# Altium PCB CPJ.PcbDoc (part 2 of 2)
Units mm, origin at the board's own origin, x right, y up, seen from the top; angles counter-clockwise.
Board outline 210 x 60 mm, 4 copper layers (Top Layer, Inner_1, PWR_SIG, Bottom Layer), stack 1.63 mm thick; 123 components, 76 nets, 368 pads, 236 vias.
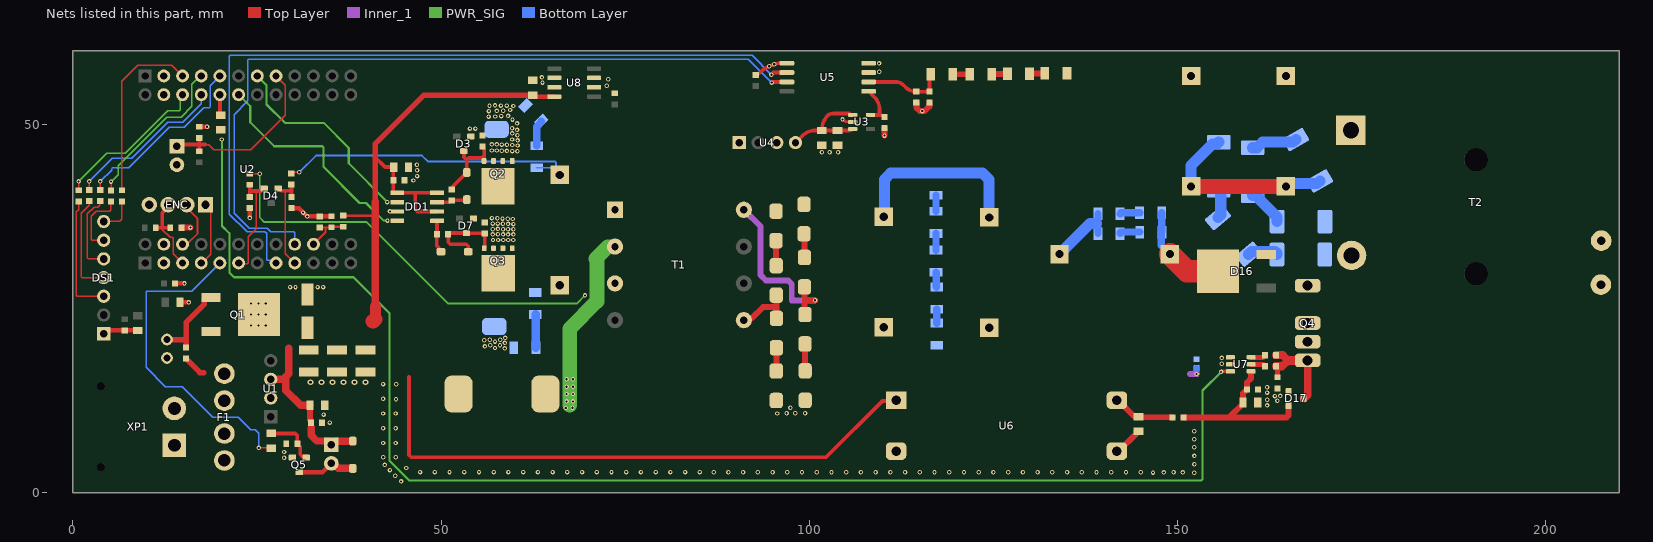
[diagram p4: the nets of this part, all layers, seen from the top]

## Via types
v1: diameter 0.6, hole 0.3, Top Layer to Bottom Layer, tented both sides, 230 vias
v2: diameter 0.8, hole 0.4, Top Layer to Bottom Layer, tented both sides, 6 vias

## Nets (pads, with @x,y where several pads share a name; then routed paths per layer and width w, separated by ;. In a path a pad name is that pad's centre, name@x,y a point inside that pad or via, vN(x,y) a via of type N, cw(c..) or ccw(c..) an arc to the next point about the centre after c; other vN are vias at no path point) (continued)
+5V_ISO_RAW: C15.2 R21.2 U3.1 U3.3 U4.4 | length 14.2
  Top Layer w0.5: U4.4@98.135,47.55 99.041,48.456 cw(c100.837,46.66) 100.837,49.2 C15.2@101.7,49.2 ; U3.3@105.925,49.4 cw(c105.442,49.883) 105.442,49.2 R21.2@103.85,49.2 C15.2@101.7,49.2 ; U3.1@105.925,51.3 105.55,51.35 105.4,51.5 103.249,51.5 ccw(c103.25,50.393) 102.415,51.12 ccw(c104.635,49.2) C15.2@101.7,49.2
+15V_SIC: C24.1 C26.1 D17.2 R48.1 U7.1 | length 23.2
  Top Layer w0.5: C24.1@158.925,12.1 C24.1@158.925,12.25 ; C26.1@159.275,13.85 159.325,13.85 C26.1@159.475,14
  Top Layer w0.8: R48.1@150.85,10.225 157.05,10.225 ; C24.1@158.925,12.1 157.05,10.225 ; C24.1@158.925,12.25 158.925,13.5 C26.1@159.275,13.85 ; C26.1@159.475,14 159.475,14.975 160.025,15.525 U7.1@160.025,16.403 ; D17.2@165.125,11.85 165.125,10.518 164.832,10.225 157.05,10.225
GND: C1.2 C2.2 C3.1 C4.1 C5.1 C6.1 C7.2 C8.2 C9.1 C10.1 C11.1 C12.1 C14.1 C18.1 C25.1 C27.1 C28.1 C29.1 C30.1 C31.1 C32.1 D2.2 D3.1 D5.2 D7.1 DD1.3 DS1.1 ENC.C NT.2 Q2.1 Q3.1 Q5.2 R1.2 R13.1 R15.1 R19.1 R20.1 R46.1 S1.3 SW1.2 U1.2 U2.3 U2.4 U2.27 U2.28 U4.1 U5.5 U6.2 U6.4 U8.2 U8.3 U8.6 U8.7 XP1.2 | length 27.6
  Top Layer w0.5: C18.1@92.75,56.75 92.925,56.784 ccw(c92.745,57.25) 93.095,56.893 cw(c96.777,53.164) 96.225,58.376 U5.5@96.975,58.33
  Top Layer w0.6: DS1.1@4.175,21.595 4.63,22.05 C7.2@7.025,22.05 8.775,22.05 C8.2@8.8,22.025 ; C31.1@13.875,28.425 v1(15.15,28.425) ; C32.1@14.55,25.85 v1(15.725,25.85) ; C9.1@17.15,49.7 v1(18.225,49.7) ; v1(24.025,37.325) R20.1@24.025,38.65 ; R15.1@29.675,38.65 30.7,38.65 v1(31.825,37.525) 35.1,37.525 R1.2@35.125,37.55
  Top Layer w0.8: C6.1@14.725,36 v1(15.95,36) ; U6.4@141.8,5.65 142.05,5.65 144.475,8.075 144.475,8.225 144.575,8.325 C25.1@144.725,8.325
  Inner_1 w0.8: 151.7,16.125 v1(152.625,16.125)
  Bottom Layer w0.3: v1(152.3,6.175) v1@152.381,6.175 ; v1(152.3,7.25) v1@152.381,7.25 ; v1(152.3,8.35) v1@152.381,8.35
  Bottom Layer w0.8: v1(152.625,16.125) NT.2@152.625,16.925
  other v1: 44.575,1.525 43.775,2.3 152.3,2.7 146.7,2.725 148.15,2.75 150.75,2.75 87.025,2.775 89.025,2.775 91.025,2.775 93.025,2.775 95.025,2.775 97.025,2.775 99.025,2.775 101.025,2.775 103.025,2.775 105.025,2.775 107.025,2.775 109.025,2.775 111.025,2.775 113.025,2.775 115.025,2.775 117.025,2.775 119.025,2.775 121.025,2.775 123.025,2.775 125.025,2.775 127.025,2.775 129.025,2.775 131.025,2.775 133.025,2.775 135.025,2.775 137.025,2.775 139.025,2.775 141.025,2.775 143.025,2.775 145.025,2.775 149.5,2.775 47.15,2.8 49.15,2.8 51.15,2.8 53.15,2.8 55.15,2.8 57.15,2.8 59.15,2.8 61.15,2.8 63.15,2.8 65.15,2.8 67.15,2.8 69.15,2.8 71.15,2.8 73.15,2.8 75.15,2.8 77.15,2.8 79.15,2.8 81.15,2.8 83.15,2.8 85.15,2.8 43.05,3.075 45.275,3.35 42.35,3.775 152.325,3.85 28.675,4.75 42.15,4.8 43.85,4.8 152.325,5 28.675,5.525 42.125,6.75 43.825,6.75 42.125,8.75 43.825,8.75 34.875,9.525 34.05,10.6 42.125,10.75 43.825,10.75 43.875,12.7 42.125,12.75 43.9,14.725 42.125,14.75 58.65,19.6 57.325,19.65 55.95,19.875 56.675,20.025 58,20.025 58.675,20.35 57.325,20.525 55.875,20.7 56.6,20.775 58.05,20.775 58.725,21.025 29.5,27.925 30.225,27.925 33.225,27.925 33.975,27.925 57.05,34.325 57.75,34.325 58.45,34.325 59.125,34.325 59.8,34.325 57.025,35.075 58.425,35.075 59.1,35.075 59.825,35.075 57.725,35.1 57.025,35.775 58.425,35.775 59.1,35.775 59.825,35.775 57.725,35.825 59.825,36.475 59.1,36.5 58.4,36.525 57.025,36.55 57.7,36.55 59.725,37.175 59.05,37.2 58.35,37.225 57.65,37.275 56.9,37.3 31.261,38.04 43.05,38.2 46.25,42.4 46.75,43 46.75,43.8 46.725,44.55 60.375,46.375 59.675,46.4 58.95,46.425 58.25,46.45 56.875,46.475 57.55,46.475 60.4,47.15 59.675,47.225 58.95,47.25 58.25,47.275 56.875,47.3 57.55,47.3 60.4,47.85 59.65,47.975 60.375,48.55 59.675,48.8 60.325,49.275 53.925,49.45 54.669,49.452 59.65,49.5 60.325,50.15 59.7,50.675 56.45,51.075 57.35,51.1 58.175,51.15 59.1,51.175 56.5,51.825 57.575,51.85 58.45,51.875 59.375,51.975 59.825,52.525 56.575,52.55 58.125,52.575 58.925,52.575 57.325,52.6 72.5,55.275 63.775,55.7 72.7,56.15 63.7,56.4 94.575,57.925 95.25,58.2
  other v2: 32.25,15 33.75,15 35.25,15 36.75,15 38.25,15 39.75,15
HV_BUS: C19.2 C20.2 C21.2 C22.2 C23.1 D8.1 D9.1 R26.1 R27.2 R34.1 R38.1 T2.1 | length 34.6
  Bottom Layer w1: R34.1@139.225,35.2 139.225,36.55 R38.1@139.225,37.9
  Bottom Layer w1.5: C19.2@110.125,37.475 110.2,37.55 110.2,42.521 111.079,43.4 R27.2@117.225,43.4 123.546,43.4 124.425,42.521 C20.2@124.425,37.375 ; C23.1@134,32.4 138.15,36.55 139,36.55
HV_GND: C15.1 C16.2 C17.1 C19.1 C20.1 D14.2 D15.2 NT.1 pad.2 Q4.2 R21.1 R22.2 R31.1 T2.3 U3.2 U4.3 U5.3 U5.4 | length 6.2
  Top Layer w0.3: U3.2@105.37,50.35 U3.2@105.925,50.35
  Top Layer w0.35: v1(104.525,50.7) ccw(c105.37,51.545) U3.2@105.37,50.35
  Top Layer w0.8: D15.2@99.248,12.898 D15.2@99.4,13.05 ; v1(110.225,48.5) C17.1@110.225,49.525 ; C16.2@114.525,52.975 114.55,52.975 114.55,52.3 115.019,51.831 115.681,51.831 116.325,52.475 116.325,53 R22.2@116.35,53
  other v1: 95.675,10.75 96.925,10.775 98.1,10.775 99.45,10.775 97.45,11.55 101.725,46.25 102.775,46.25 103.925,46.25 115.35,51.831 109.525,57.175 109.5,58.3
HV_OUT: 
NetC1_1: C1.1 R1.1 R3.2 U2.44 | length 6.3
  Top Layer w0.15: U2.44@32.665,33.725 U2.44@32.85,33.725 ; R1.1@35.125,36.05 R1.1@35.2,36.125
  Top Layer w0.3: U2.44@32.665,33.725 34.288,35.347 34.288,35.987 ; C1.1@33.525,36.025 35.1,36.025 R1.1@35.125,36.05 ; R1.1@35.2,36.125 R3.2@36.7,36.125
NetC6_2: C6.2 ENC.D R4.1 U2.29 | length 11.5
  Top Layer w0.2: 12.15,36 12.15,35.725 13.2,34.675 13.483,34.675 13.6,34.558 13.6,32.47 U2.29@14.885,31.184
  Top Layer w0.5: R4.1@11.25,36 12.15,36 ; ENC.D@12.925,39.125 12.925,38.807 12.15,38.032 12.15,36 ; C6.2@13.225,36 12.15,36
NetC9_2: C9.2 R5.1 SW1.1 U2.15 | length 24.6
  Top Layer w0.2: 17.937,47.288 18.437,47.288 19.15,46.575 24.15,46.575 28.85,51.275 28.85,55.32 U2.15@27.585,56.585
  Top Layer w0.5: SW1.1@14.22,47 14.508,47.288 17.15,47.288 ; R5.1@17.15,46.375 17.15,47.288 ; C9.2@17.15,48.2 17.15,47.288 ; 17.937,47.288 17.15,47.288
NetC12_2: C12.2 R11.1 | length 3.6
  Bottom Layer w1: R11.1@62.975,47.125 62.975,49.712 63.611,50.348 C12.2@63.611,50.489
NetC14_2: C14.2 R17.1 | length 4.5
  Bottom Layer w1.2: C14.2@62.85,19.675 R17.1@62.85,24.2
NetC16_1: C16.1 R22.1 R23.2 U5.2 | length 11
  Top Layer w0.5: U5.2@108.075,55.79 111.727,55.79 cw(c111.727,54.202) 112.85,55.325 113.117,55.058 ccw(c114.525,56.467) C16.1@114.525,54.475 116.29,54.475 ccw(c116.29,54.56) R22.1@116.35,54.5 116.35,56.463 cw(c116.862,56.463) R23.2@116.5,56.825
NetC17_2: C17.2 U3.5 U5.1 | length 5.7
  Top Layer w0.5: U5.1@108.075,54.52 108.817,53.778 cw(c107.021,51.982) 109.561,51.982 109.561,51.3 ; U3.5@108.325,51.3 109.561,51.3 ; C17.2@110.225,51.025 ccw(c109.561,50.361) 109.561,51.3
NetC21_1: C21.1 C22.1 R32.2 R33.2 | length 25.7
  Top Layer w2: C21.1@151.875,41.6 C22.1@164.75,41.6
  Bottom Layer w1.5: C21.1@151.875,41.6 151.875,44.45 154.775,47.35 155.375,47.35 R32.2@155.625,47.6 ; C22.1@164.75,41.6 165.12,41.97 168.985,41.97 R33.2@169.35,42.335
NetC23_2: C23.2 D16.2 R35.2 R39.2 | length 13.7
  Top Layer w3: C23.2@149,32.4 151.325,30.075 154.625,30.075 D16.2@155.525,30.075 D16.2@155.625,30.075
  Bottom Layer w1: R35.2@147.875,35.425 R39.2@147.875,38.025 ; R35.2@147.9,35.4 147.807,35.307 147.807,33.593 C23.2@149,32.4
NetC25_2: C25.2 R48.2 U6.3 | length 8.5
  Top Layer w0.8: U6.3@141.825,12.5 142.025,12.5 144.1,10.425 144.625,10.425 144.8,10.25 149.35,10.25 R48.2@149.35,10.225
NetD1_1: D1.1 DD1.7 R14.1 | length 4.2
  Top Layer w0.5: DD1.7@49.45,39.46 51.185,39.46 51.425,39.7 R14.1@51.45,39.7 53.4,39.7 D1.1@53.5,39.8
NetD1_2: D1.2 D3.3 Q2.2 R13.2 R14.2 | length 10.9
  Top Layer w0.5: R14.2@51.45,41.2 51.475,41.2 51.625,41.35 51.625,41.625 53.15,43.15 53.25,43.15 D1.2@53.5,43.4 ; D3.3@53.1,46.4 53.114,46.386 53.114,45.543 53.5,45.157 ; D1.2@53.5,43.5 53.5,45.157 ; R13.2@55.625,47.025 55.65,47.025 55.8,46.875 55.8,46.627 55.845,46.582 55.845,45.75 ; Q2.2@55.845,44.975 55.845,45.75 ; 53.5,45.157 53.793,45.45 55.545,45.45 55.845,45.75
NetD4_1: D4.1 R12.1 R15.2 U2.41 | length 14
  Top Layer w0.2: 28.845,41 28.845,32.465 U2.41@30.125,31.184
  Top Layer w0.5: D4.1@27.875,41.325 27.975,41.325 28.3,41 28.845,41 29.675,41 ; R12.1@29.65,41.875 29.675,41.85 29.675,41 ; R15.2@29.675,40.15 29.675,41
NetD4_2: D4.2 R18.1 R20.2 U2.35 | length 15.4
  Top Layer w0.2: U2.35@22.505,31.184 22.59,31.1 23.683,31.1 23.8,31.217 23.8,34.75 24.903,35.853 24.903,40.988
  Top Layer w0.5: R20.2@24.025,40.15 24.025,40.988 ; R18.1@24.025,41.825 24.025,40.988 ; D4.2@25.975,41.325 25.875,41.325 25.537,40.988 24.903,40.988 24.025,40.988
NetD6_1: D6.1 DD1.5 R16.1 | length 4.5
  Top Layer w0.5: DD1.5@49.45,36.92 49.45,35.125 R16.1@49.425,35.1 49.425,33.525 49.65,33.3 49.65,32.975 49.9,32.725 D6.1@50,32.725
NetD6_2: D6.2 D7.3 Q3.2 R16.2 R19.2 | length 11.9
  Top Layer w0.5: R16.2@50.925,35.107 50.925,35.125 51.075,35.275 D7.3@53.425,35.275 ; R16.2@50.968,35.1 50.968,34.043 51.261,33.75 53.4,33.75 53.693,33.457 53.693,32.732 D6.2@53.7,32.725 ; D7.3@53.45,35.25 55.9,35.25 R19.2@55.95,35.2 55.95,33.37 55.855,33.275 Q3.2@55.855,33.2
NetD8_2: D8.2 D10.1 | length 3.4
  Top Layer w0.8: D10.1@95.5,30.85 D8.2@95.5,34.225
NetD9_2: D9.2 D11.1 | length 3.2
  Top Layer w0.8: D9.2@99.3,35.15 cw(c99.179,35.029) 99.35,35.029 D11.1@99.35,31.95
NetD10_2: D10.2 D12.1 T1.8 | length 8.3
  Top Layer w0.8: T1.8@91.125,23.425 91.393,23.693 92.218,23.693 93.725,25.2 95.55,25.2 ; D10.2@95.525,26.825 cw(c95.465,26.765) 95.55,26.765 95.55,25.2 ; D12.1@95.55,23.675 95.55,25.2
NetD11_2: D11.2 D13.1 T1.5 | length 25.2
  Top Layer w0.8: D11.2@99.35,27.95 99.35,26.125 ; D13.1@99.425,24.2 cw(c99.606,24.381) 99.35,24.381 99.35,26.125 ; v1(100.8,26.125) 99.35,26.125
  Inner_1 w0.8: T1.5@91.125,38.425 93.4,36.15 93.4,29.55 94.125,28.825 97.156,28.825 97.625,28.356 97.625,26.125 v1(100.8,26.125)
NetD12_2: D12.2 D14.1 | length 3.2
  Top Layer w0.8: D14.1@95.525,16.525 ccw(c95.465,16.585) 95.55,16.585 D12.2@95.55,19.675
NetD13_2: D13.2 D15.1 | length 3.7
  Top Layer w0.8: D15.1@99.4,17.05 ccw(c99.34,17.11) D15.1@99.425,17.11 ; D15.1@99.425,16.55 D13.2@99.425,20.2
NetD18_2: D18.2 Q5.3 SOL1.2 | length 8.1
  Top Layer w0.6: Q5.3@30.75,2.775 33.895,2.775 SOL1.2@35.1,3.98
  Top Layer w1: SOL1.2@35.1,3.98 35.371,3.98 36.051,3.3 D18.2@38.025,3.3
NetDD1_2: DD1.2 U2.13 | length 27.5
  PWR_SIG w0.3: U2.13@25.045,56.585 26.3,55.33 26.3,52.725 28.798,50.227 34.048,50.227 37.45,46.825 37.45,44.725 v1(42.7,39.475)
NetDD1_4: DD1.4 U2.12 | length 30.1
  PWR_SIG w0.3: U2.12@22.505,54.044 24.075,52.474 24.075,50.3 27.326,47.049 33.874,47.049 34.05,46.874 34.05,44.225 38.925,39.35 39.8,39.35 42.2,36.95 v1(42.725,36.95)
NetDS1_3: DS1.3 R6.1 | length 16.7
  Top Layer w0.2: R6.1@0.775,39.575 0.775,38.45 0.475,38.15 0.475,26.792 0.592,26.675 DS1.3@4.175,26.675
NetDS1_4: DS1.4 R8.1 | length 14
  Top Layer w0.2: R8.1@2.225,39.6 2.192,39.567 2.192,39.017 1.1,37.925 1.1,29.332 1.217,29.215 DS1.4@4.275,29.175
NetDS1_5: DS1.5 R10.2 | length 11.1
  Top Layer w0.2: R10.2@3.7,39.625 3.642,39.567 3.642,39.042 3.399,38.799 2.874,38.799 1.949,37.874 1.949,31.872 2.066,31.755 DS1.5@4.175,31.755
NetDS1_6: DS1.6 R9.1 | length 9
  Top Layer w0.2: DS1.6@4.175,34.295 2.617,34.295 2.5,34.412 2.5,37.54 3.2,38.24 5.033,38.24 5.15,38.357 5.15,39.525 R9.1@5.175,39.55
NetDS1_7: DS1.7 R7.1 | length 5
  Top Layer w0.2: DS1.7@4.175,36.835 6.36,36.835 6.65,37.125 R7.1@6.65,39.575
NetENC_A: ENC.A U2.31 | length 8.8
  Top Layer w0.2: U2.31@17.425,31.184 17.484,31.184 18.7,32.4 18.7,38.43 ENC.A@18.005,39.125
NetENC_B: ENC.B U2.30 | length 7.2
  Top Layer w0.25: U2.30@14.885,33.725 15.172,34.012 15.737,34.012 16.925,35.2 16.925,37.229 15.465,38.689 ENC.B@15.465,39.125
NetF1_2: F1.2 Q1.3 R2.2 | length 3.2
  Top Layer w0.75: R2.2@15.35,18.2 15.375,18.2 15.4,18.175 15.4,18.15 17.25,16.3 17.775,16.3
NetQ1_1: Q1.1 R2.1 S1.2 | length 11.2
  Top Layer w0.75: S1.2@12.775,20.8 15.372,20.8 R2.1@15.372,19.722 ; 15.422,20.8 15.422,23.162 17.825,25.565 17.825,26.265 18.05,26.49 Q1.1@18.75,26.49
NetQ5_1: Q5.1 R45.1 R46.2 | length 7.6
  Top Layer w0.5: R45.1@26.925,8.05 30.182,8.05 30.475,7.757 R46.2@30.475,6.65 ; R46.2@30.475,6.625 30.875,6.225 30.875,5.218 31.168,4.925 31.783,4.925 Q5.1@31.933,4.775
NetR6_2: R6.2 U2.6 | length 21.2
  Top Layer w0.2: R6.2@0.775,41.075 v1(0.775,42.275)
  PWR_SIG w0.2: v1(0.775,42.275) 4.625,46.125 7.1,46.125 12.85,51.875 14.458,51.875 14.575,51.992 14.575,53.152 14.588,53.166 14.588,53.748 U2.6@14.885,54.044
NetR7_2: R7.2 U2.5 | length 24.6
  Top Layer w0.2: R7.2@6.65,41.075 6.65,55.9 8.825,58.075 13.395,58.075 U2.5@14.885,56.585
NetR8_2: R8.2 U2.8 | length 22
  Top Layer w0.2: R8.2@2.225,41.1 v1(2.225,42.275)
  Bottom Layer w0.2: v1(2.225,42.275) 5.35,45.4 8,45.4 12.9,50.3 14.9,50.3 17.425,52.825 U2.8@17.425,54.044
NetR9_2: R9.2 U2.7 | length 21.8
  Top Layer w0.2: R9.2@5.175,41.05 v1(5.175,42.25)
  PWR_SIG w0.2: v1(5.175,42.25) 6.125,43.2 6.125,44.375 12.775,51.025 14.7,51.025 16.15,52.475 16.15,55.45 17.285,56.585 U2.7@17.425,56.585
NetR10_1: R10.1 U2.9 | length 25.1
  Top Layer w0.2: R10.1@3.7,41.125 v1(3.7,42.275)
  Bottom Layer w0.2: v1(3.7,42.275) 5.25,43.825 5.25,43.983 5.367,44.1 7.575,44.1 13.1,49.625 15.15,49.625 17.8,52.275 18.558,52.275 18.675,52.392 18.675,55.294 U2.9@19.965,56.585
NetR23_1: R23.1 R24.2 | length 2.3
  Top Layer w0.8: R23.1@119.5,56.825 119.512,56.838 121.788,56.838 R24.2@121.8,56.85
NetR24_1: R24.1 R25.2 | length 2.1
  Top Layer w0.8: R24.1@124.8,56.85 124.825,56.875 126.9,56.875 R25.2@126.925,56.9
NetR25_1: R25.1 R26.2 | length 2.1
  Top Layer w0.8: R25.1@129.925,56.9 129.975,56.95 131.95,56.95 R26.2@132,57
NetR27_1: R27.1 R28.2 | length 2.2
  Bottom Layer w1: R28.2@117.225,38.225 R27.1@117.225,40.4
NetR28_1: R28.1 R29.2 | length 2.3
  Bottom Layer w1: R29.2@117.225,32.95 R28.1@117.225,35.225
NetR29_1: R29.1 R30.2 | length 2.1
  Bottom Layer w1: R29.1@117.225,29.95 117.263,29.913 117.263,27.963 R30.2@117.3,27.925
NetR30_1: R30.1 R31.2 | length 1.9
  Bottom Layer w1: R30.1@117.3,24.925 117.313,24.913 117.313,23.038 R31.2@117.325,23.025
NetR32_1: R32.1 R36.2 | length 4
  Bottom Layer w1.5: R36.2@155.511,37.365 155.897,37.75 155.897,40.85 155.647,41.1 R32.1@155.625,41.1
NetR33_1: R33.1 R37.2 | length 6.3
  Bottom Layer w1.5: R37.2@160.225,46.85 160.825,46.85 161.575,47.6 165.735,47.6 R33.1@166.1,47.965
NetR34_2: R34.2 R35.1 | length 2.8
  Bottom Layer w1: R34.2@142.225,35.2 142.225,35.3 142.325,35.4 R35.1@144.9,35.4
NetR36_1: R36.1 R40.2 | length 4.3
  Bottom Layer w1.5: R36.1@159.689,32.385 160.075,32.771 163.275,32.771 163.525,32.521 R40.2@163.525,32.35
NetR37_1: R37.1 R41.2 | length 5.3
  Bottom Layer w1.5: R37.1@160.225,40.35 160.825,40.35 161.075,40.1 161.075,39.9 163.55,37.425 R41.2@163.55,36.825
NetR38_2: R38.2 R39.1 | length 2.7
  Bottom Layer w1: R38.2@142.225,37.9 142.225,37.925 142.325,38.025 R39.1@144.875,38.025
NetR42_2: R42.2 U7.2 | length 2
  Top Layer w0.7: U7.2@160.025,17.425 161.675,17.425 R42.2@161.925,17.175
NetR43_2: R43.2 U7.3 | length 2
  Top Layer w0.7: U7.3@160.025,18.375 161.625,18.375 R43.2@161.925,18.675
NetR45_2: R45.2 U2.33 | length 44.6
  Top Layer w0.2: v1(25.25,6.075) 26.9,6.075 R45.2@26.925,6.05
  Bottom Layer w0.2: U2.33@19.965,31.184 16.156,27.375 10.042,27.375 9.925,27.258 9.925,17.025 12.55,14.4 14.85,14.4 18.975,10.275 22.475,10.275 24.175,8.575 24.75,8.575 25.25,8.075 v1(25.25,6.075)
NetR47_1: R47.1 U7.6 | length 191.1
  Top Layer w0.5: v1(155.95,16.4) 155.977,16.4 156.052,16.475 U7.6@157.225,16.475
  PWR_SIG w0.25: 21.25,29.901 21.25,35.225
  PWR_SIG w0.3: v1@20.244,47.956 20.244,36.231 21.25,35.225 ; 21.25,29.901 21.876,29.275 38.1,29.275 43,24.375 43,4.325 45.675,1.65 153.249,1.65 153.425,1.826 153.425,13.875 v1(155.95,16.4)
  other v1: 20.225,47.975
NetR47_2: R47.2 U2.10 | length 2.8
  Top Layer w0.5: U2.10@19.965,54.044 19.965,51.41 R47.2@20.1,51.275
NetU2_39: U2.39 U5.6 | length 109.6
  Top Layer w0.5: v1(94.875,56.775) 95.16,57.06 U5.6@96.975,57.06
  Bottom Layer w0.2: U2.39@27.585,31.184 27.289,31.481 26.762,31.481 26.693,31.55 26.417,31.55 26.3,31.667 26.3,35.225 26.075,35.45 23.65,35.45 21.25,37.85 21.25,59.283 21.367,59.4 92.25,59.4 v1(94.875,56.775)
NetU2_42: U2.42 U5.7 | length 107.1
  Top Layer w0.5: v1(94.925,55.7) 95.015,55.79 U5.7@96.975,55.79
  Bottom Layer w0.2: U2.42@30.125,33.725 30.125,35.308 30.008,35.425 26.85,35.425 26.375,35.9 23.975,35.9 21.9,37.975 21.9,51.35 23.75,53.2 23.75,58.783 23.867,58.9 91.725,58.9 v1(94.925,55.7)
SIC_DRAIN: D16.3 Q4.1 R40.1 R41.1 T2.2
SIC_GATE: D17.3 Q4.4 R42.1 R43.1 R44.2 | length 13.2
  Top Layer w0.7: R42.1@163.425,17.175 163.425,17.15 163.6,16.975 R44.2@163.6,15.675 ; R43.1@163.425,18.675 163.425,18.7 R43.1@163.6,18.875
  Top Layer w1: D17.3@167.188,12.737 167.7,13.25 Q4.4@167.7,17.965
  Top Layer w1.1: R42.1@163.425,17.175 164.245,17.175 165.035,17.965 164.325,18.675 R43.1@163.425,18.675
  Top Layer w1.2: 165.035,17.965 Q4.4@167.125,17.965
SIC_KELVIN: C24.2 C26.2 D17.1 Q4.3 R44.1 U7.4 U7.5
  other v1: 162.2,11.85 163.6,12.5 162.225,12.625 163.25,13.125 163.975,13.15 162.2,13.6 162.2,14.325 156.025,17.525 156.025,18.3
VBAT_RAW: F1.1 XP1.1
VBAT_SW: C2.1 C3.2 C4.2 C5.2 C10.2 C11.2 C27.2 C28.2 C29.2 D18.1 DD1.1 DD1.6 DD1.8 L1.1 Q1.2 R3.1 SOL1.1 U1.3 U6.1 U8.8 | length 176
  Top Layer w0.3: R3.1@36.7,37.625 41.075,37.625 41.1,37.625
  Top Layer w0.5: 41.075,45.55 42.4,44.225 C11.2@43.575,44.225 ; C11.2@43.525,44.175 C10.2@43.525,42.425 43.525,40.78 43.575,40.73 DD1.1@44.05,40.73 46.513,40.73 ; 45.65,15.75 45.65,5.093 45.943,4.8 102.3,4.8 109.943,12.443 U6.1@111.8,12.443 ; DD1.6@49.45,38.19 46.805,38.19 46.513,38.483 46.513,40.73 ; DD1.8@49.45,40.73 46.513,40.73
  Top Layer w0.6: C29.2@62.425,54 62.575,54 62.78,53.795 U8.8@65.375,53.795
  Top Layer w0.75: 41.075,39.8 41.075,45.55 41.075,47.4 47.675,54 C29.2@62.425,54
  Top Layer w0.8: C27.2@32.2,11.875 32.2,11.873 32.2,9.909 32.35,9.759 C28.2@32.35,9.5 32.35,8.825
  Top Layer w1: U1.3@26.875,15.39 28.54,15.39 28.92,15.77 ; 29.3,19.609 29.3,16.15 28.92,15.77 ; C27.2@32.2,11.873 30.927,11.873 28.92,13.88 28.92,15.77 ; 32.35,8.825 32.35,7.8 33.13,7.02 34.6,7.02 SOL1.1@35.1,6.52 35.58,7 D18.1@38.025,7 ; 41.075,25.3 41.075,37.625 41.075,39.5
  Top Layer w1.5: 41.075,23.575 41.075,25.3 ; L1.1@52.371,13.396 L1.1@52.375,13.4
  Top Layer w2: 40.77,23.27 41.075,23.575
ZVS_CT: L1.2 T1.2 | length 24.8
  PWR_SIG w2: 67.475,11.875 67.475,13.4 67.475,22.275 71.175,25.975 71.175,31.9 ; 71.05,31.775 71.175,31.9 ; T1.2@73.625,33.425 73.587,33.387 72.662,33.387 71.175,31.9
  other v1: 66.925,11.5 67.85,11.525 67.05,12.4 67.925,12.4 67.05,13.4 67.925,13.4 67.05,14.4 67.925,14.4 67.05,15.4 67.925,15.4
ZVS_DRAIN1: C13.2 D2.1 Q2.3 R11.2 R12.2 T1.1 | length 40.6
  Top Layer w0.25: R12.2@29.65,43.375 29.8,43.525 v1(30.75,43.525)
  Bottom Layer w0.25: v1(30.75,43.525) 33.025,45.8 47.4,45.8 48.2,45 65.45,45 65.596,44.854 65.596,44.3 65.421,44.125 R11.2@62.975,44.125
ZVS_DRAIN2: C13.1 D5.1 Q3.3 R17.2 R18.2 T1.3 | length 56.8
  Top Layer w0.25: R18.2@24.025,43.325 v1(25.375,43.325)
  PWR_SIG w0.25: v1(25.375,43.325) 25.375,37.375 26,36.75 39.9,36.75 50.975,25.675 68.425,25.675 v1(69.55,26.8)
pads on no net: D3.2 D7.2 D16.1 T1. T2. U1.4 U2.11 U2.14 U2.16 U2.17 U2.18 U2.19 U2.20 U2.21 U2.22 U2.23 U2.24 U2.32 U2.34 U2.36 U2.37 U2.38 U2.40 U2.43 U2.45 U2.46 U2.47 U2.48 U3.4 U8.4 U8.5 XP1.

## Polygon pours and split planes (outlines as drawn)
ZVS_DRAIN1 on Bottom Layer "GND_TOP" (solid, pour order 23): 67.425,41.875 67.117,41.542 cw(c66.656,42.003) 66.653,41.351 56.498,41.4 cw(c56.501,42.001) 55.9,42.001 55.9,43.25 cw(c56.912,43.337) 56.901,44.354 cw(c67.322,-52.237) 62.078,44.773 cw(c62.842,10.31) 67.425,44.475 67.425,44.39
ZVS_DRAIN2 on Bottom Layer "GND_TOP" (solid, pour order 22): 67.425,29.475 59.525,29.475 cw(c59.525,29.983) 59.053,29.795 ccw(c57.564,29.202) 58.594,30.431 ccw(c58.364,30.157) 58.364,30.514 ccw(c57.259,13.389) 56.154,30.514 ccw(c56.113,29.927) 55.525,29.968 55.525,27.275 ccw(c56.25,27.275) 56.25,26.55 67.075,26.55 ccw(c67.075,26.9) 67.425,26.9
GND on Bottom Layer "GND_TOP" (solid, pour order 25): 61.499,51.732 60.45,49.65 59.234,48.434 cw(c58.609,49.059) 58.609,48.175 56.431,48.175 cw(c56.431,48.744) 55.862,48.731 55.846,49.388 cw(c68.526,49.689) 55.997,51.662 56.123,52.463 cw(c56.685,52.374) 56.693,52.943 61.667,53.617 62.525,52.758
GND on Bottom Layer "GND_TOP" (solid, pour order 24): 58.895,23.205 58.895,22.631 ccw(c60.725,22.405) 60.5,20.575 60.5,18.8 56.55,18.8 cw(c56.75,20.05) 55.5,20.25 55.5,23.175 cw(c56.104,23.175) 56.104,23.779 58.321,23.779 cw(c58.321,23.205)
HV_GND on Bottom Layer "HV_GND" (solid, pour order 2): 120.599,25.185 118.4,23.668 116.338,23.667 113.825,24.525 cw(c120.547,38.222) 108.979,28.274 cw(c116.554,34.788) 106.616,33.759 105.784,41.791 cw(c110.761,41.643) 108.414,46.035 115.94,50.058 ccw(c114.995,51.826) 117,51.826 117,53.45 113.525,53.45 cw(c113.685,56.575) 110.556,56.575 110.556,60 105.257,60 105.257,54.279 cw(c102.662,54.863) 103.725,52.425 99.625,50.725 95.377,48.786 ccw(c95.638,47.753) 94.587,47.93 94.605,47.462 ccw(c96.383,47.531) 95.461,46.01 cw(c94.144,43.836) 96.535,44.698 102.175,29.568 cw(c94.106,26.461) 102.175,23.352 cw(c59.983,39.604) 96.686,13.2 94.647,10 104.732,10 104.732,14.052 cw(c107.988,14.052) 107.98,17.309 151.993,17.425 152.528,17.475 ccw(c152.474,18.055) 152.983,17.772 153.232,18.218 cw(c156.175,16.58) 153.979,19.134 154.893,19.921 155.59,20.334 cw(c158.044,16.209) 157.016,20.898 157.588,21.024 164.785,21.986 167.65,21.986 171.779,21.986 171.875,17.675 172.267,0 209.963,0 209.963,35.9 208.132,35.9 ccw(c208.12,33.656) 206.175,34.775 cw(c193.203,42.122) 192.625,27.225 ccw(c185.637,-144.952) 178.65,27.225 ccw(c175.985,-49.452) 166.213,26.646 cw(c160.607,122.324) 148.699,27.225 cw(c147.187,127.458) 139.014,27.547 ccw(c135.37,-17.004)
SIC_DRAIN on Bottom Layer "HV_GND" (solid, pour order 6): 175.285,31.019 175.542,31.458 175.682,32.103 175.607,32.732 175.434,33.197 175.176,33.557 173.306,35.033 172.16,36.179 170.933,38.425 169.089,38.425 168.961,30.75 170.9,30.75 173.454,30.25 174.274,30.292 174.972,30.647
GND on Inner_1 "GND_TOTAL" (solid, pour order 0): 0,0 152.525,0 152.175,17.435 145.668,17.435 145.487,8.089 78.85,8.089 78.85,38.55 86.725,46.425 92.04,46.356 92.009,48.474 94.7,53.325 101.475,53.325 101.475,59.999 0,59.95
SIC_KELVIN on Inner_1 "KELVIN" (solid, pour order 4): 166.275,21.464 163,20.925 155.35,18.85 155.35,11.325 170.2,11.325 170.2,21.464
ZVS_DRAIN1 on Top Layer "GND_TOP" (solid, pour order 27): 74.775,37.275 74.775,39.555 ccw(c74.183,39.555) 74.228,40.146 cw(c74.775,47.368) 69.654,42.246 67.425,44.475 67,44.475 64.85,44.475 60.033,44.172 55.45,44.172 55.45,39.125 ccw(c55.7,39.125) 55.7,38.875 65.638,38.875 cw(c65.638,32.389) 69.867,37.307 ccw(c70.762,38.347) 70.762,36.975 74.475,36.975 ccw(c74.475,37.275)
NetR47_1 on Top Layer "NETR47_1_L01_P034" (solid, pour order 34): 19.879,48.016 19.4,48.691 19.4,49.791 20.8,49.791 20.8,48.716 20.475,48.016 cw(c20.163,48.073) 20.465,47.973 cw(c20.177,48.067) 19.915,47.917 cw(c20.188,48.074)
GND on Top Layer "GND_TOP" (solid, pour order 33): 69.775,56.575 69.775,54.825 ccw(c69.875,54.825) 69.875,54.725 72.2,54.725 73.125,53.8 74.075,53.8 74.075,56.45 ccw(c73.85,56.45) 73.85,56.675 69.875,56.675 ccw(c69.875,56.575)
GND on Top Layer "GND_TOP" (solid, pour order 32): 64.39,54.76 63.863,55.287 ccw(c63.469,54.893) 63.469,55.45 61.725,55.45 61.725,56.55 cw(c62.027,56.249) 62.027,56.675 66.264,56.685 cw(c66.265,56.575) 66.375,56.575 66.375,54.716 64.523,54.705 cw(c64.522,54.891)
GND on Top Layer "GND_TOP" (solid, pour order 31): 45.025,44.925 45.025,43.525 44.575,43.075 44.575,41.95 46.849,41.95 ccw(c46.849,42.153) 47.051,42.151 47.073,44.725 ccw(c46.875,44.727) 46.875,44.925
GND on Top Layer "GND_TOP" (solid, pour order 28): 53.587,47.963 cw(c53.587,48.05) 53.5,48.05 53.5,49.575 cw(c53.675,49.575) 53.675,49.75 57.051,49.956 cw(c57.89,36.19) 60.131,49.798 60.365,49.759 cw(c60.293,49.319) 60.739,49.336 60.805,47.582 cw(c55.336,47.429) 60.298,45.123 cw(c54.503,47.813) 60.025,44.6 56.95,44.6 cw(c56.95,45) 56.55,45 56.55,47.725 ccw(c56.29,47.725) 56.288,47.985
GND on Top Layer "GND_TOP" (solid, pour order 26): 56.75,32.95 56.75,36.25 55.5,36.25 53.909,36.838 cw(c53.94,36.922) 53.85,36.922 53.85,37.55 cw(c54,37.55) 54,37.7 59.35,37.7 cw(c59.236,36.749) 60.187,36.862 60.187,32.75 56.95,32.75 cw(c56.95,32.95)
HV_BUS on Top Layer "HV_GND" (solid, pour order 8): 137.627,43.278 137.688,43.353 137.97,43.635 138.091,43.729 138.194,43.807 138.555,43.996 139.1,44.175 139.278,44.207 175.575,47.15 175.525,47.2 175.525,59.95 134.223,59.95 134.223,54.728 cw(c133.255,54.728) 133.681,53.859 108.54,41.527 cw(c105.394,47.12) 105.394,40.703 99.083,40.703 ccw(c99.082,31.403) 95.997,40.176 94.951,39.809 ccw(c95.175,39.172) 94.5,39.172 94.5,38.825 94.5,37.6 ccw(c95.1,37.6) 95.1,37 96.172,37 ccw(c96.172,43.278) 97.51,37.144 99.642,37.609 cw(c100.475,33.791) 101.148,37.641 107.075,36.604 108.9,36.175 131.719,30.805 ccw(c133.682,39.146) 133.682,30.577 135.363,30.577 ccw(c135.363,30.993) 135.774,30.936 137.367,42.578 137.388,42.693 137.428,42.823 137.606,43.244
ZVS_DRAIN2 on Top Layer "GND_TOP" (solid, pour order 21): 55.475,32.325 62.09,32.346 cw(c62.1,29.197) 64.326,31.424 64.728,31.022 ccw(c67.376,33.67) 67.376,29.925 72.75,29.925 cw(c72.581,26.997) 74.15,29.475 cw(c73.581,28.425) 74.298,27.47 cw(c71.409,29.731) 73.117,26.484 cw(c72.471,27.712) 72.471,26.325 56.475,26.325 cw(c56.475,27.325) 55.475,27.325
VBAT_SW on Top Layer "VBAT_SW_TOP" (solid, pour order 17): 30.65,18.8 30.7,18.75 41.15,18.75 50.072,11.454 ccw(c51.516,12.879) 51.3,10.862 53.254,10.862 ccw(c53.33,11.845) 54.315,11.805 54.315,14.872 ccw(c52.426,14.744) 53.307,16.42 42.514,23.061 ccw(c39.548,18.24) 39.548,23.9 32.675,23.9 31.025,23.9 cw(c34.274,29.587) 28.175,27.2 22.4,27.2 22.4,21.225
ZVS_CT on Top Layer "GND_TOP" (solid, pour order 20): 63.233,15.975 67.575,15.975 cw(c67.575,15.3) 68.25,15.3 68.25,11.5 cw(c67.625,11.5) 67.625,10.875 63.195,10.875 cw(c63.195,11.868) 62.202,11.883 62.249,15.006 cw(c63.233,14.991)
GND on Top Layer "GND_TOP" (solid, pour order 19): 29.15,28.6 34.525,28.6 34.525,27.325 32.775,25.35 31.025,25.35 29.125,27.25 29.125,28.575
GND on Top Layer "GND_TOP" (solid, pour order 18): 30.625,17 30.675,17.05 41.1,17.05 41.1,13.975 41.075,13.975 30.65,13.975
VBAT_RAW on Top Layer "VABT_RAW_TOP" (solid, pour order 13): 20.375,9.5 ccw(c19.892,-11.784) 12.161,8.052 12.134,4.784 ccw(c18.79,12.44) 12.96,4.139 ccw(c17.643,10.807) 17.643,2.658 20.033,2.658 ccw(c19.76,5.323) 20.898,2.898 ccw(c19.881,5.065) 22.275,5.065 22.275,7.6 ccw(c20.375,7.6)
NetF1_2 on Top Layer "FUSE_TOP" (solid, pour order 14): 20.825,11 ccw(c20.812,12.76) 22.573,12.766 22.557,18.01 ccw(c17.794,17.996) 21.267,21.254 20.075,22.525 17.425,22.525 17.407,14.4 ccw(c20.8,14.393)
HV_GND on Top Layer "HV_GND" (solid, pour order 11): 95.076,13.575 99.95,13.575 cw(c99.95,13.175) 100.35,13.175 100.35,9.975 94.647,9.975 94.647,13.149 cw(c95.076,13.146)
HV_GND on Top Layer "HV_GND" (solid, pour order 10): 107.075,57.65 107.075,58.45 cw(c107.237,58.487) 107.2,58.65 109.875,58.65 109.875,56.732 108.554,56.734 107.221,56.736 cw(c107.246,56.951) 107.202,56.739 cw(c107.232,56.881) 107.154,56.759 cw(c107.292,56.972) 107.149,56.762 cw(c107.245,56.902) 107.075,56.902
HV_GND on Top Layer "HV_GND" (solid, pour order 9): 101.05,47.7 104.5,47.7 104.5,45.8 101.05,45.8
SIC_DRAIN on Top Layer "HV_GND" (solid, pour order 5): 175.619,31.569 175.665,31.736 175.696,31.904 175.72,32.077 175.728,32.253 175.696,32.615 175.605,32.923 175.481,33.225 175.197,33.649 174.938,33.863 174.653,34.053 174.216,34.215 173.875,34.275 173.563,34.273 173.418,34.256 173.273,34.235 172.952,34.145 172.827,34.091 172.703,34.031 172.466,33.882 172.328,33.77 172.198,33.648 172.125,33.575 172.021,33.521 171.9,33.475 171.7,33.399 171.36,33.382 163.395,32.98 161.055,32.98 ccw(c161.055,32.7) 160.775,32.7 160.775,31.785 ccw(c160.858,31.785) 160.819,31.712 165.586,29.15 cw(c165.292,28.603) 165.912,28.633 165.96,27.626 ccw(c166.434,27.649) 166.434,27.175 168.925,27.175 ccw(c168.925,28.165) 169.436,27.317 174.391,30.3 174.809,30.512 175.134,30.783 175.299,30.969 175.507,31.298

## Other copper
Top Layer:
  region net GND: 44.906,38.544 42.469,38.544 ccw(c42.469,38.415) 42.34,38.415 42.34,37.961 ccw(c42.458,37.961) 42.457,37.843 43.706,37.832 44.919,37.843 ccw(c44.917,37.991) 45.065,37.991 45.065,38.385 ccw(c44.906,38.385)
  region net NetDD1_2: 44.915,39.81 42.385,39.81 ccw(c42.385,39.75) 42.325,39.75 42.325,39.175 ccw(c42.4,39.175) 42.4,39.1 44.9,39.1 ccw(c44.9,39.25) 45.05,39.25 45.05,39.675 ccw(c44.915,39.675)
  region net NetDD1_4: 44.915,37.285 42.385,37.285 ccw(c42.385,37.225) 42.325,37.225 42.325,36.65 ccw(c42.4,36.65) 42.4,36.575 44.9,36.575 ccw(c44.9,36.725) 45.05,36.725 45.05,37.15 ccw(c44.915,37.15)
  region net GND: 44.3,15.146 44.3,4.8 45.875,3.225 46.825,3.1 46.825,2.5 46.55,2.5 45.3,2.675 43.425,4.55 43.425,15.175
  region net GND: 42.55,15.121 42.575,4.082 45.125,1.5 44.522,0.897 41.675,3.945 41.675,15.15
  region net GND: 46.825,3.1 151.953,3.1 151.953,8.675 152.65,8.675 152.65,2.342 46.825,2.511
  region net GND: 33.663,12.213 33.663,10.213 33.413,9.963 33.413,9.088 35.238,9.088 35.238,10.188 34.763,12.213
  region net GND: 29.575,7.138 28.3,7.138 28.3,4.363 30.3,4.363 30.3,5.188 30.225,5.263 29.575,5.263
  region net SIC_KELVIN: 161.7,14.7 165.575,14.7 165.7,14.575 165.7,13.225 164.347,13.225 164.347,11.35 161.675,11.35 160.25,11.35 160.25,14.7
  region net SIC_KELVIN: 157.85,17.1 157.85,18.65 155.55,18.675 155.55,17.1
Bottom Layer:
  region net VBAT_SW: 29.589,27.2 22.4,27.2 22.4,22.325 22.975,21.75 29.51,21.75

## Silkscreen, mask and mechanical layers (free items; w line width, h text height)
Top Overlay:
  text "QZ_G" at 206.109,24.542 h0.8
  text "BY YMNIKAKTYS" at 71.753,11.675 h1.5
Board Shape:
  lines w0.1: 0,0 0,60 210,60 210,0 0,0 ; 101.76,53.325 101.76,59.375 103.805,59.375 103.748,53.325 101.76,53.325

## Text inside footprints (layer, text, board x,y; h text height)
C2: Top Overlay "+" at 35.833,21.15 h0.8 r90
DS1: Top Overlay "GND" at 1.375,20.599 h0.8 r270; Top Overlay "VCC" at 1.375,23.149 h0.8 r270; Top Overlay "D0" at 1.375,25.999 h0.8 r270; Top Overlay "D1" at 1.375,28.682 h0.8 r270; Top Overlay "RES" at 1.375,30.699 h0.8 r270; Top Overlay "DC" at 1.375,33.623 h0.8 r270; Top Overlay "CS" at 1.375,36.198 h0.8 r270
F1: Top Overlay "FUSE" at 24.375,13.891 h0.8 r270
Q4: Top Overlay "G" at 171.4,18.333 h1 r270; Top Overlay "KS" at 171.45,21.408 h1 r270; Top Overlay "S" at 171.525,23.458 h1 r270; Top Overlay "D" at 166.15,31.817 h1 r90
S1: Top Overlay "SW" at 10.375,21.466 h0.8 r270; Top Overlay "GND" at 10.375,19.366 h0.8 r270
SOL1: Top Overlay "SOL" at 33.305,3.895 h0.7 r90; Top Overlay "+" at 34.687,8.88 h0.8 r270
SW1: Top Overlay "FIRE" at 12.125,44.275 h0.8 r90; Top Overlay "+" at 13.712,49.455 h0.8 r270
T1: Top Overlay "D1" at 76.125,39.133 h0.8 r270; Top Overlay "7.4V" at 76.15,34.875 h0.8 r270; Top Overlay "D2" at 76.15,29.091 h0.8 r270; Top Overlay "SEC1" at 89.642,41.85 h0.8; Top Overlay "SEC2" at 89.409,19.375 h0.8
T2: Top Overlay "+850V" at 171.792,51.7 h1; Top Overlay "DRAIN" at 177.976,29.025 h1; Top Overlay "GND" at 206.242,36.225 h1
U1: Bottom Overlay "3V3" at 23.876,9.171 h0.8 r270; Bottom Overlay "GND" at 23.951,11.846 h0.8 r270; Bottom Overlay "VIN" at 24.001,14.471 h0.8 r270
U6: Bottom Overlay "VOUT+" at 145.9,10.734 h0.8 r270; Bottom Overlay "VOUT-" at 145.9,3.734 h0.8 r270; Bottom Overlay "VIN" at 107.701,13.599 h0.8 r90; Bottom Overlay "GND" at 107.701,6.666 h0.8 r90
XP1: Top Overlay "+" at 14.974,0.651 h1.5 r90